# Altium PCB PCB2wires.PcbDoc
Units mm, origin at the board's own origin, x right, y up, seen from the top; angles counter-clockwise.
Board outline 60.32 x 64.06 mm, 2 copper layers (Top Layer, Bottom Layer); 15 components, 13 nets, 88 pads, 48 vias.
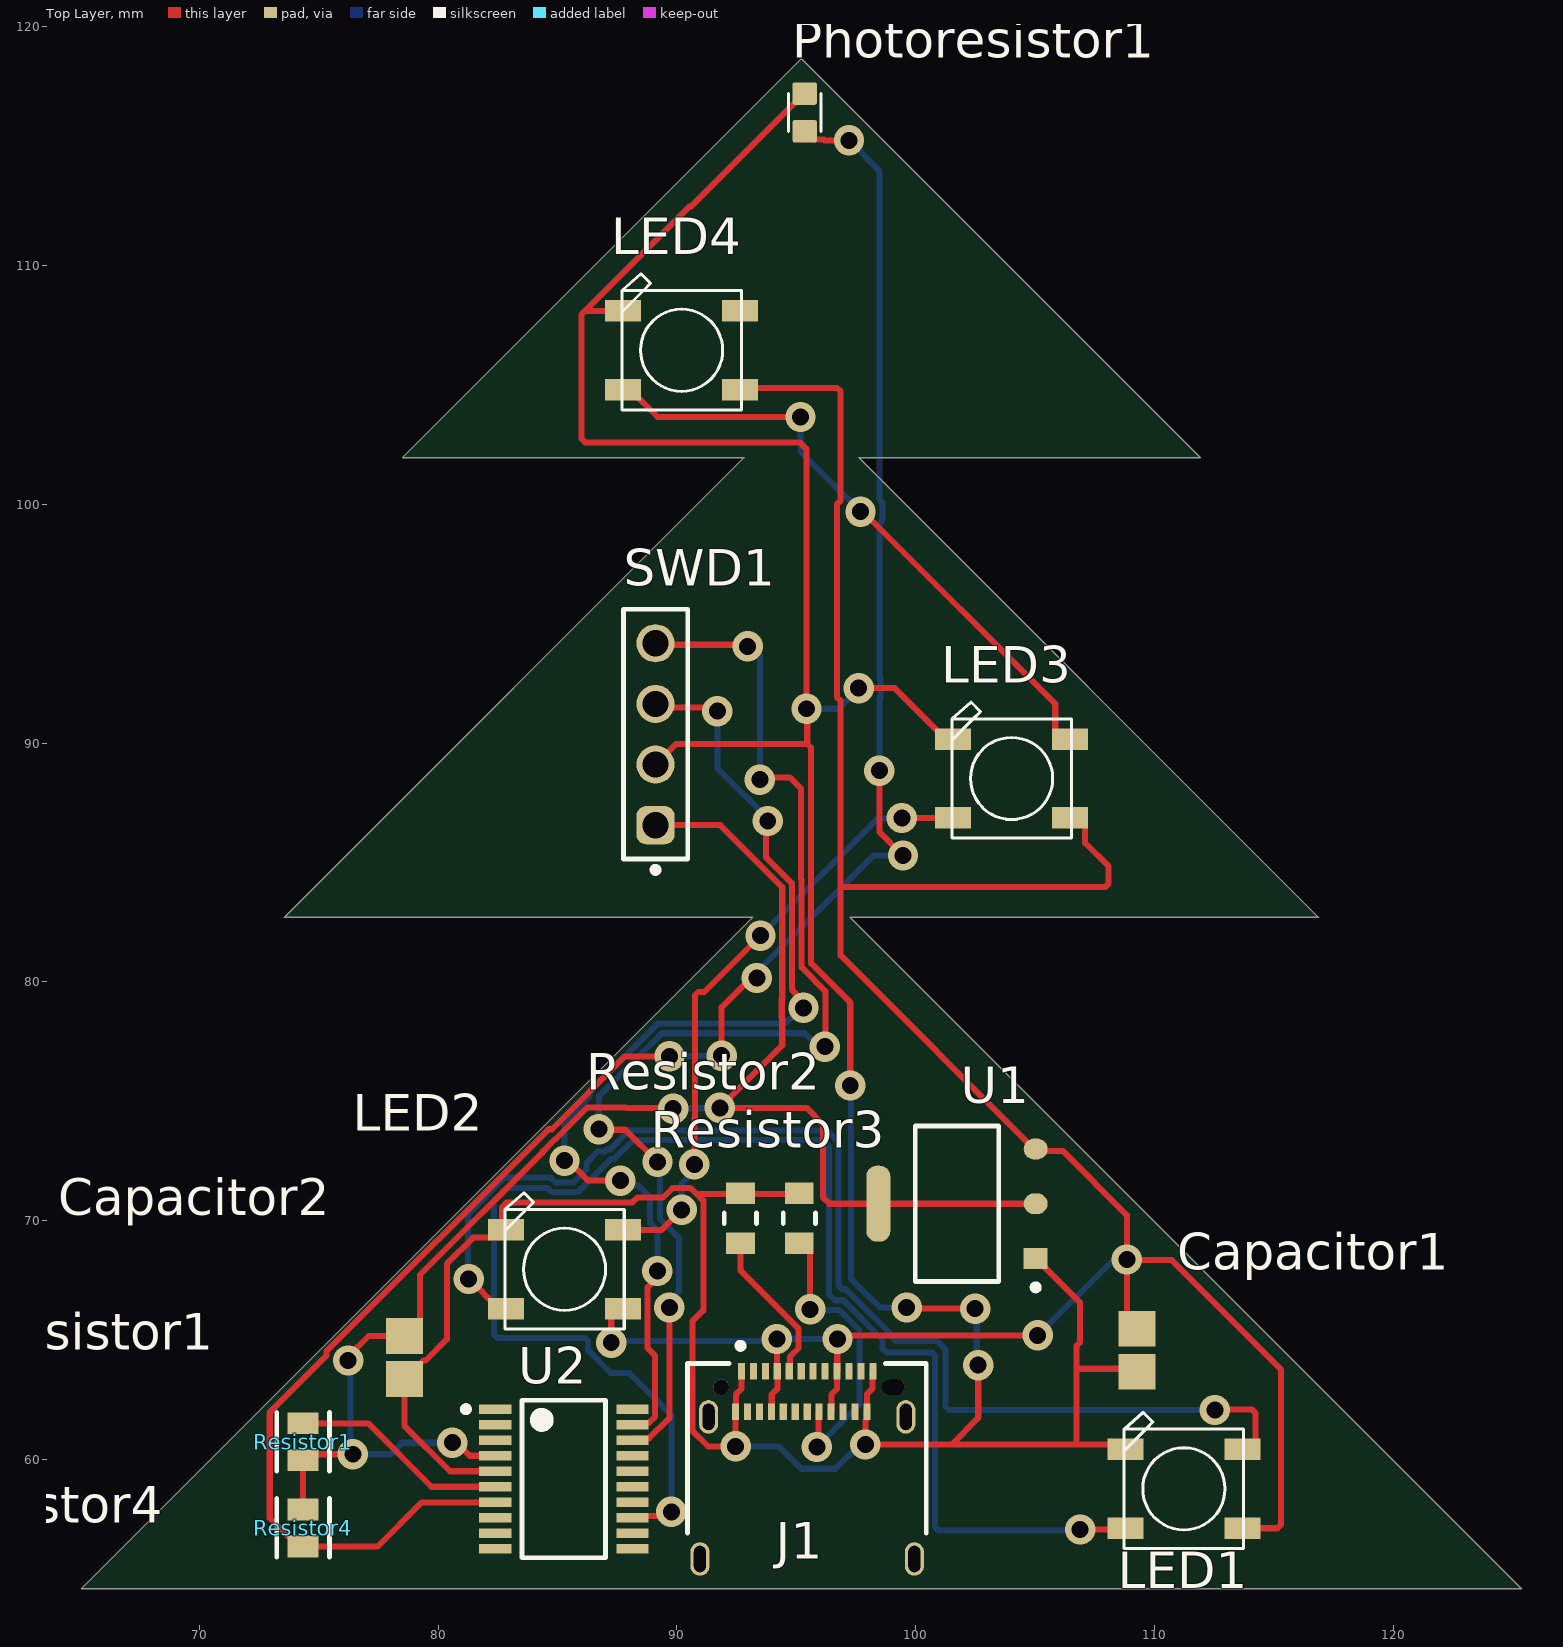
[diagram p0: Top Layer view]
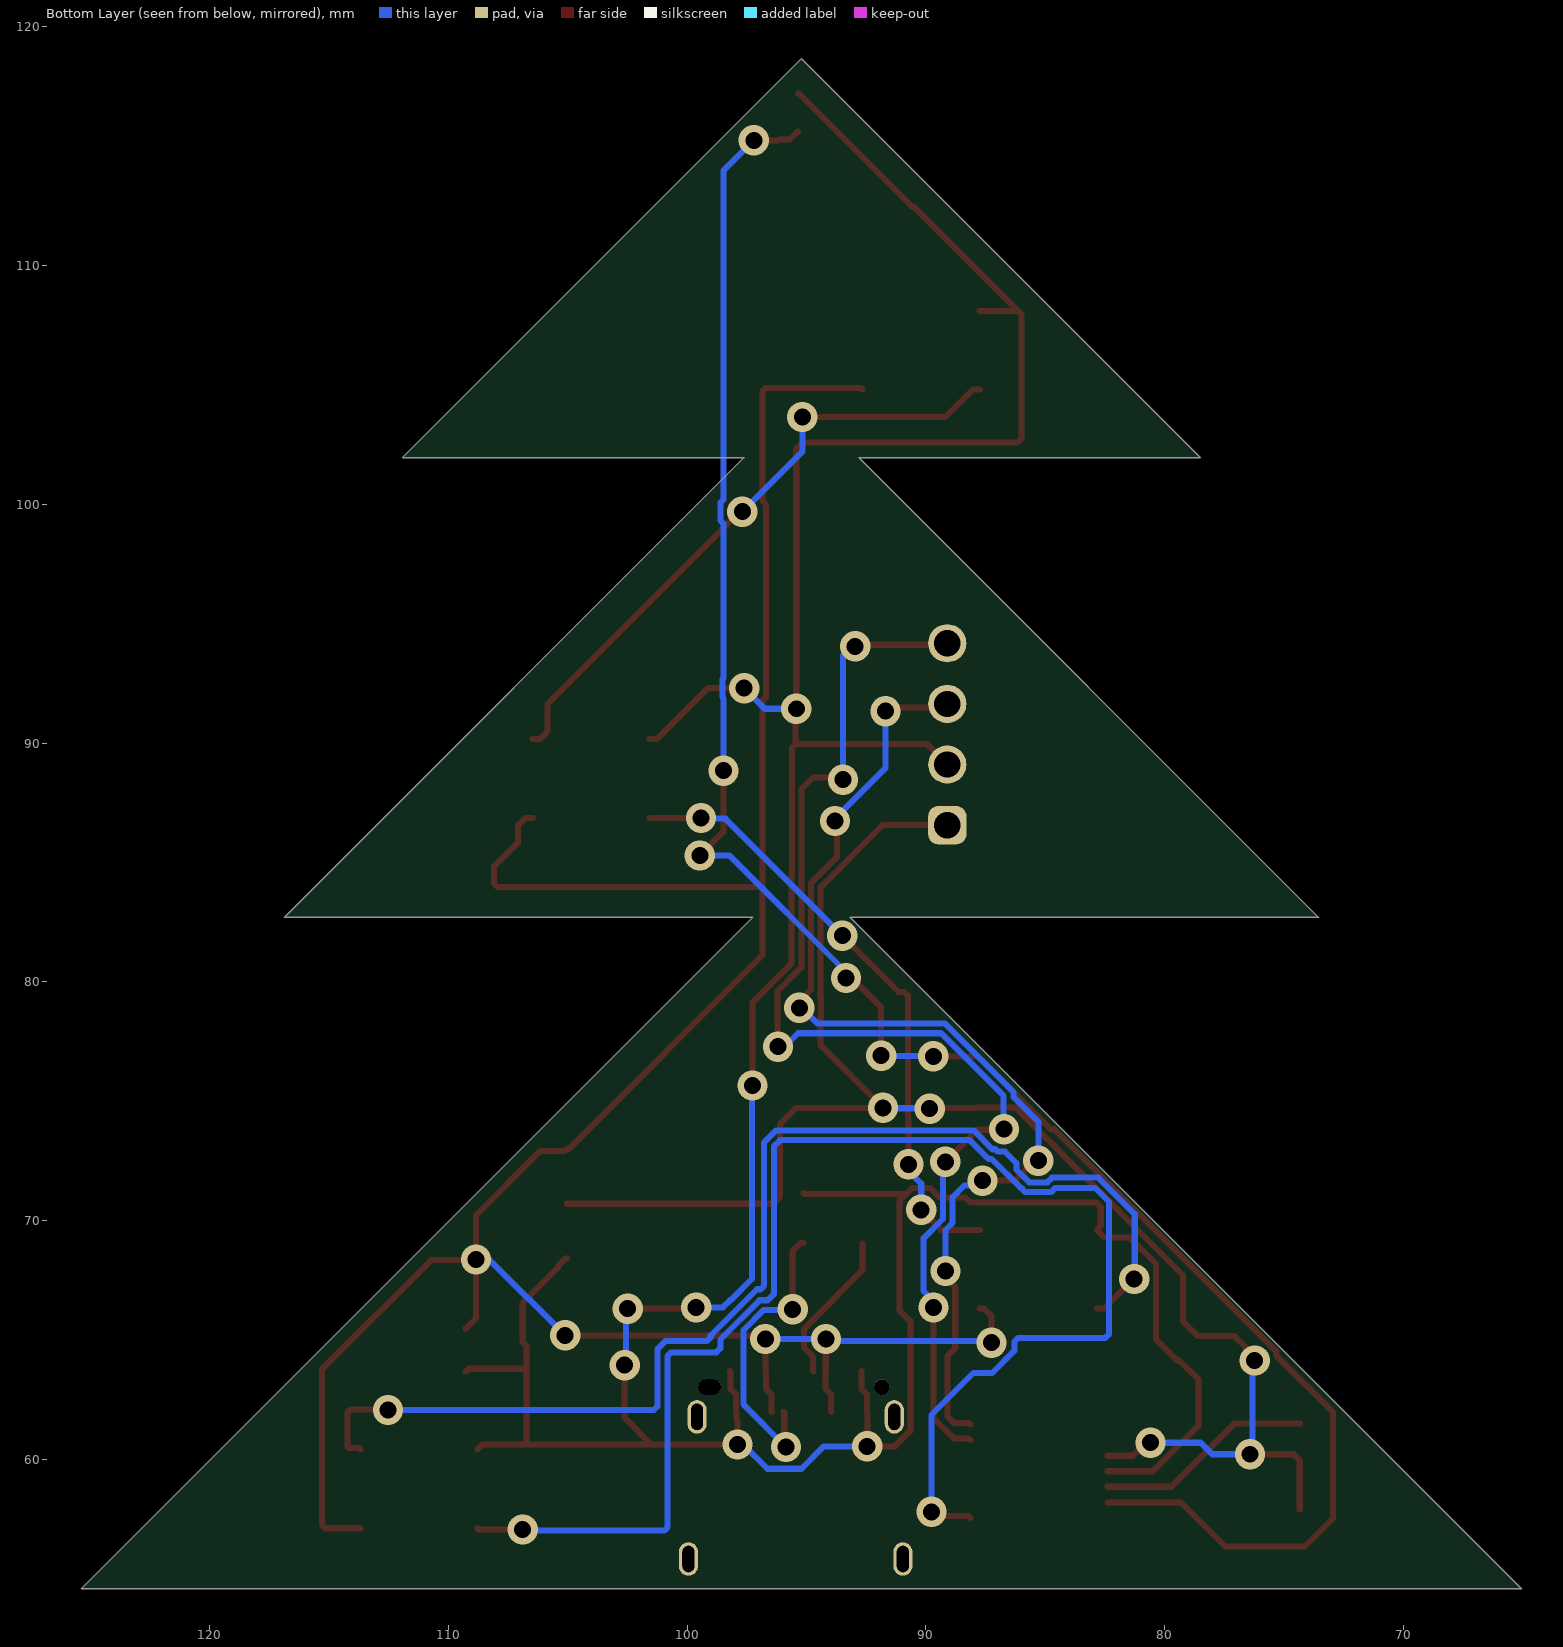
[diagram p1: Bottom Layer view, seen from below]
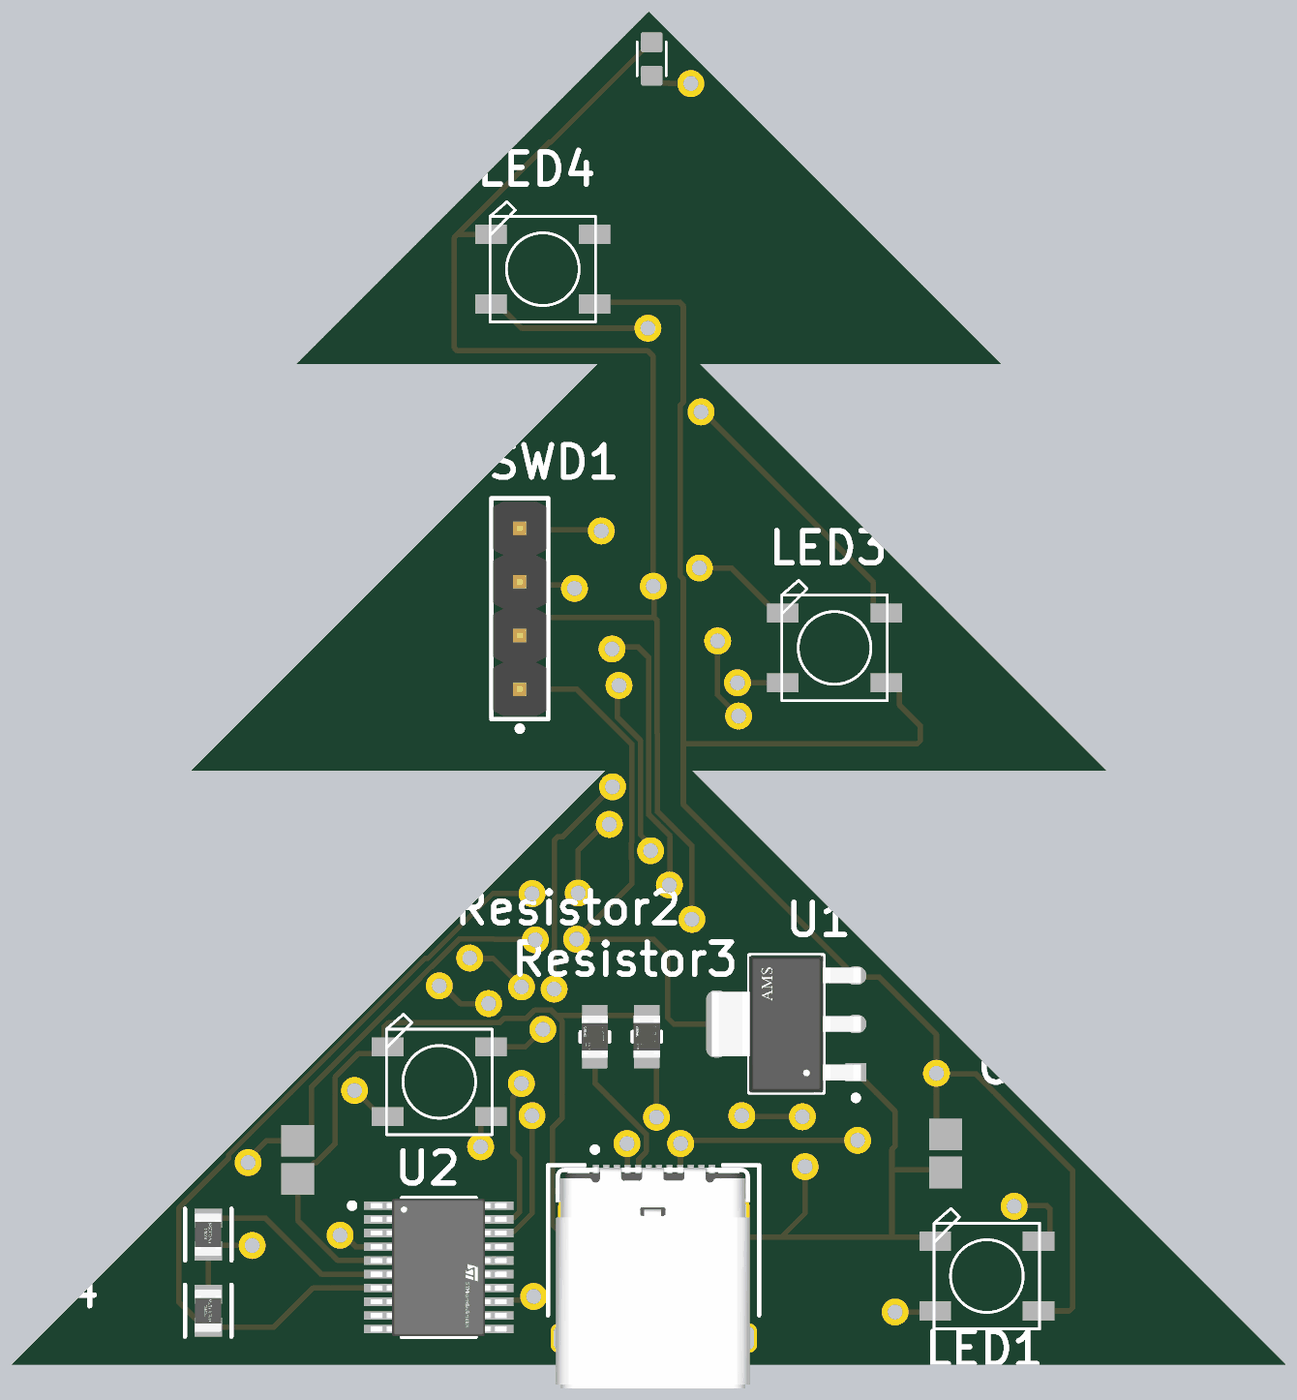
[diagram p2: 3D render of the assembled board from above, using the file's embedded part models]

## Layer stack, top to bottom
Top Solder: solder mask 0.0102, Solder Resist, Dk 3.5
Top Layer: signal copper 0.0356
Dielectric 1: dielectric 0.32, FR-4, Dk 4.8
Bottom Layer: signal copper 0.0356
Bottom Solder: solder mask 0.0102, Solder Resist, Dk 3.5

## Board outline
73.558,82.702 93.167,82.702 65.049,54.585 125.374,54.585 97.257,82.702 116.865,82.702 97.612,101.956 111.912,101.956 95.225,118.643 95.199,118.643 78.511,101.956 92.812,101.956

## Design rules (kind name [scope] priority, off if disabled: settings)
Clearance [All] p1: gap=0.15 ignorepadtopadclearanceinfootprint=TRUE
MinimumSolderMaskSliver [All] p1: minsoldermaskwidth=0
PolygonConnect [All] p1: connectstyle=Relief reliefconductorwidth=0.254 reliefentries=4 polygonreliefangle="90 Angle" airgapwidth=0.254
RoutingVias [All] p1: holewidth=0.711 width=1.27 viastyle="Through Hole" minholewidth=0.711 minwidth=1.27 maxholewidth=0.711 maxwidth=1.27
SilkToSilkClearance [All] p1: silktosilkclearance=0
SilkToSolderMaskClearance [IsPad] p1: minsilkscreentomaskgap=0 clearancetoexposedcopper=TRUE
SolderMaskExpansion [All] p1: expansion=0 istentingtop=FALSE
SupplyNets "Schematic Supply Nets_2" [InNet('+5V')] p1: voltage=0.000
SupplyNets "Schematic Supply Nets_1" [InNet('+3.3V')] p2: voltage=0.000
SupplyNets "Schematic Supply Nets" [InNet('GND')] p3: voltage=0.000
Width [All] p1: maxlimit=0.254 minlimit=0.254 preferedwidth=0.254
27 further rules are at their usual default settings.

## Classes and differential pairs
component class Sheet1: Capacitor1 Capacitor2 LED1 LED2 LED3 LED4 Photoresistor1 Resistor1 Resistor2 Resistor3 Resistor4 SWD1 U1 U2

## Components (designator, comment, footprint, x,y, rotation, side; value= is the part's Value field where it differs from the comment)
Capacitor1 "08056D106KAT4A" CAPC2013X140X50ML20T25 109.271,64.581 r90 top
Capacitor2 "08056D106KAT4A" CAPC2013X140X50ML20T25 78.588,64.276 r90 top
J1 "12401832E402A" FP-12401832E402A-MFG 95.453,58.674 r0 top
LED1 "WS2812B" *WS2812B_WS2812B(Primary) 111.227,58.776 r0 top
LED2 "WS2812B" *WS2812B_WS2812B(Primary) 85.293,67.97 r0 top
LED3 "WS2812B" *WS2812B_WS2812B(Primary) 104.013,88.519 r0 top
LED4 "WS2812B" *WS2812B_WS2812B(Primary) 90.195,106.451 r0 top
Photoresistor1 "1-1614350-8" RESC1608X50N 95.352,116.408 r90 top
Resistor1 "CRGCQ0805J10K" FP-CRGCQ0805-IPC_C 74.346,60.743 r90 top value=10KΩ
Resistor2 "RT0805BRD075K1L" FP-RT0805-MFG 92.659,70.104 r90 top value=5.1KΩ
Resistor3 "RT0805BRD075K1L" FP-RT0805-MFG 95.123,70.113 r90 top value=5.1KΩ
Resistor4 "CRGCQ0805J10K" FP-CRGCQ0805-IPC_C 74.346,57.136 r270 top value=10KΩ
SWD1 "61300411121" 61300411121 89.103,90.373 r90 top
U1 "AMS1117-3.3" FP-AMS1117-IPC_C 101.727,70.714 r180 top
U2 "STM32G030F6P6" FP-TSSOP20-YA-MFG 85.263,59.187 r0 top

## Footprints (in the part's own frame and the unit in brackets; to place one, negate y for a bottom-side part, rotate by r counter-clockwise, add the part's x,y. Pads: shape width x height; smd on the part's side, far side on the other; paste and mask are expansions set on the pad)
61300411121 [mm] "Pin Header, pitch 2.54 mm, THT, Vertical, single row, 4p"
  rrect50% 1.6x1.6 hole 1.1: 1(-3.81,0)
  round 1.6 hole 1.1: 2(-1.27,0) 3(1.27,0) 4(3.81,0)
  silkscreen extent -5.8,-1.35 5.23,1.35, body extent -5.08,-1.27 5.08,1.27, height 8.57
*WS2812B_WS2812B(Primary) [mm]
  rect 1.5x0.9 smd: 1-VDD(2.45,-1.65) 2-DOUT(2.45,1.65) 3-GND(-2.45,1.65) 4-DIN(-2.45,-1.65)
  silkscreen extent -2.5,-2.5 2.5,3.2
CAPC2013X140X50ML20T25 [mm] "Chip Capacitor, 2-Leads, Body 2.00x1.25mm, IPC Low Density"
  rect 1.5x1.55 smd: 1(-0.9,0) 2(0.9,0)
  body extent -1.1,-0.72 1.1,0.72, height 1.4
FP-12401832E402A-MFG [mm]
  rrect100% 0.8x1.4 hole 1.1 slot 0.5 at 0 deg paste-2539.97 mask+0: 1(-4.13,3.115) 2(4.13,3.115) 3(-4.49,-2.835) 4(4.49,-2.835)
  rect 0.3x0.7 smd paste+0 mask+0: A1(-2.75,5.025) A2(-2.25,5.025) A3(-1.75,5.025) A4(-1.25,5.025) A5(-0.75,5.025) A6(-0.25,5.025) A7(0.25,5.025) A8(0.75,5.025) A9(1.25,5.025) A10(1.75,5.025) A11(2.25,5.025) A12(2.75,5.025) B1(2.5,3.325) B2(2,3.325) B3(1.5,3.325) B4(1,3.325) B5(0.5,3.325) B6(0,3.325) B7(-0.5,3.325) B8(-1,3.325) B9(-1.5,3.325) B10(-2,3.325) B11(-2.5,3.325) B12(-3,3.325)
  round 0.65 hole 0.65 unplated paste-2539.97 mask+0: ""(-3.6,4.365)
  rrect100% 0.95x0.65 hole 0.65 slot 0.95 at 0 deg unplated paste-2539.97 mask+0: ""(3.6,4.365)
  silkscreen extent -5.01,-1.76 4.99,6.21, body extent -4.99,-5.45 4.99,5.48, height 0.25
FP-AMS1117-IPC_C [mm]
  rect 1.004x0.872 smd paste+0 mask+0: 1(-3.295,2.29)
  rrect100% 1.004x0.872 smd paste+0 mask+0: 2(-3.295,0) 3(-3.295,-2.29)
  rrect87% 1.004x3.182 smd paste+0 mask+0: 4(3.295,0)
  silkscreen extent -3.42,-3.25 1.75,3.62, body extent -3.9,-3.35 3.9,3.35, height 0.25
FP-CRGCQ0805-IPC_C [mm]
  rect 0.906x1.31 smd paste+0 mask+0: 1(-0.776,0) 2(0.776,0)
  silkscreen extent -1.23,-1.1 1.23,1.1, body extent -1,-0.63 1,0.63, height 0.65
FP-RT0805-MFG [mm]
  rect 0.9x1.2 smd paste+0 mask+0: 1(-1.05,0) 2(1.05,0)
  silkscreen extent -0.23,-0.67 0.23,0.67, body extent -1.6,-0.77 1.6,0.77, height 0.25
FP-TSSOP20-YA-MFG [mm]
  rect 1.35x0.4 smd paste+0 mask+0: 1(-2.875,2.925) 2(-2.875,2.275) 3(-2.875,1.625) 4(-2.875,0.975) 5(-2.875,0.325) 6(-2.875,-0.325) 7(-2.875,-0.975) 8(-2.875,-1.625) 9(-2.875,-2.275) 10(-2.875,-2.925) 11(2.875,-2.925) 12(2.875,-2.275) 13(2.875,-1.625) 14(2.875,-0.975) 15(2.875,-0.325) 16(2.875,0.325) 17(2.875,0.975) 18(2.875,1.625) 19(2.875,2.275) 20(2.875,2.925)
  silkscreen extent -4.22,-3.3 1.75,3.3, body extent -3.65,-3.55 3.65,3.55, height 0.25
RESC1608X50N [mm]
  rrect20% 0.94x1.02 smd: 1(-0.79,0) 2(0.79,0)
  silkscreen extent -0.8,-0.69 0.8,0.69

## Part data
Capacitor1 Capacitor2: library part CMP-2007-04644-1, Manufacturer="AVX Interconnect / Elco", Part Number=08056D106KAT4A
J1: library part CMP-02355-000004-1, "CONN RCP USB3.1 TYPEC 24P SMD RA"
Photoresistor1: "RN 0603 12K1 0.1% 10PPM CUT LENGTH /  / PDV-P2002", Package=None, Availability=Unavailable, MP=1-1614350-8, Price=None
Resistor1 Resistor4: library part CMP-03211-002989-1, "CRGCQ 0805 10K 5%", Ambient Temperature Range High=+70°C, Manufacturer="TE Connectivity", Package=CRGCQ0805, Power Rating=0.125W, Resistance=10KΩ, Temperature="-55°C to +155°C", Temperature Coefficient=±100ppm/°C, Temperature Range High=+155°C, Temperature Range Low=-55°C, Tolerance=0.05, Voltage Rating=150V, Automotive=Yes, Automotive Grade="Grade 914", Category=Res, ComponentLink2Description=Datasheet, ComponentLink2URL=https://www.te.com/commerce/DocumentDelivery/DDEController?Action=showdoc&DocId=Data+Sheet%7F1773204-3%7F1%7Fpdf%7FEnglish%7FENG_DS_1773204-3_1.pdf%7F4-2176341-923, Composition="Thick Film", Device Class L1="Passive Components", Device Class L2=Resistors, Device Class L3="Chip SMD Resistors", Digikey Description="CRGCQ 0805 10K 5%", Height=0.65mm, Ipc Land Pattern Name=RESC200125X55, Lead Free=Yes, Manufacturer Part Number=CRGCQ0805J10K, Mouser Description="Res Thick Film 0805 10K Ohm 5% 0.125W(1/8W) ±100ppm/C Pad SMD Automotive T/R", Octopart=https://octopart.com/crgcq0805j10k-te+connectivity-91018201, RoHS=TRUE, Series=CRGCQ
Resistor2 Resistor3: library part CMP-2001-01553-2, "RES SMD 5.1K OHM 0.1% 1/8W 0805", Manufacturer=Yageo, Package=RT0805, Power Rating=0.125W, Resistance=5.1KΩ, Temperature="-55°C to +155°C", Temperature Coefficient="25 ppm/°C", Temperature Range High=+155°C, Temperature Range Low=-55°C, Tolerance=0.0025, Voltage Rating=150V, Automotive=No, Category=Res, ComponentLink2Description=Datasheet, ComponentLink2URL=http://www.yageo.com/documents/recent/PYu-RT_1-to-0.01_RoHS_L_9.pdf, Composition="Thin Film", Device Class L1="Passive Components", Device Class L2=Resistors, Device Class L3="Chip SMD Resistors", Digikey Description="RES SMD 5.1K OHM 0.1% 1/8W 0805", Footprint Url=http://www.yageo.com/exep/pages/download/literatures/PYu-R_Mount_10.pdf, Height=0.6mm, Ipc Land Pattern Name=RESC200125X50, Lead Free=Yes, Manufacturer Part Number=RT0805BRD075K1L, Mouser Description="Res Thin Film 0805 5.1K Ohm 0.1% 1/8W ±10ppm/°C Molded SMD Paper T/R", Octopart=https://octopart.com/rt0805brd075k1l-yageo-1209369, RoHS=TRUE, Series=RT
SWD1: library part CMP-1502-01064-4, "THT Vertical Pin Header WR-PHD, Pitch 2.54 mm, Single Row, 4 pins", Color=Black, Contact Resistance=20mΩ, Current Rating=3A, Max Operating Temperature=105°C, Min Operating Temperature=-40°C, Operating Supply Voltage=250V, Connector Type="Male Pin", Contact Material=Gold, Contact Mating Length=5.9944mm, Contact Plating=Gold, Gender=Male, Height=8.89mm, Lead Free="Lead Free", Lead Pitch=2.54mm, Mount="Through Hole", Number of Contacts=4, Number of Pins=4, Number of Positions=4, Number of Rows=1, Orientation=Vertical, Packaging=Bulk, Pitch=2.54mm, RoHS=Compliant, Termination=Solder, Voltage Rating=250V
U1: library part CMP-209535-000001-1, "LDO Voltage Regulators 1A, 3.3V", Dropout Voltage=1.1V, Manufacturer="Advanced Monolithic Systems", Max Junction Temp=+125°C, Max Power Dissipation=1.2W, Max Supply Voltage=15V, Nominal Supply Current=5mA, Output Current=1A, Output Voltage=3.3V, Package=AMS1117, Temperature="-40°C to +125°C", Temperature Range Low=-40°C, Automotive=No, Category=IC, ComponentLink2Description=Datasheet, ComponentLink2URL=http://www.advanced-monolithic.com/pdf/ds1117.pdf, Device Class L1="Integrated Circuits (ICs)", Device Class L2="Power Management ICs", Device Class L3="Voltage Regulators - Linear", Height=1.8mm, Ipc Land Pattern Name=SOT229P700X180-4, Lead Free=Yes, Manufacturer Part Number=AMS1117-3.3, Number Of Outputs=1, Octopart=https://octopart.com/ams1117-3.3-advanced+monolithic+systems-25899300, Output Type=Fixed, RoHS=TRUE, Standoff Height=0.64mm, Temperature Range High=+125°C
U2: library part CMP-12105-000034-1, "ARM MICROCONTROLLERS - MCU", Ambient Temperature Range High=+85°C, Ambient Temperature Range Low=-40°C, Frequency=64MHz, Manufacturer=STMicroelectronics, Max Junction Temp=+105°C, Max Supply Voltage=3.6V, Min Supply Voltage=2V, Package=TSSOP20-YA, Temperature="-40°C to +85°C", Automotive=No, Category=IC, ComponentLink2Description=Datasheet, ComponentLink2URL=https://www.st.com/resource/en/datasheet/stm32g030f6.pdf, Core Architecture="ARM Cortex-M0+", Data Bus Width=32bits, Device Class L1="Integrated Circuits (ICs)", Device Class L2="Embedded Processors and Controllers", Device Class L3=Microcontrollers, Digikey Description="ARM MICROCONTROLLERS - MCU", Height=1.2mm, Interface=I2C,SPI,USART,LIN,IrDA,I2S,SMBus, Lead Free=Yes, Manufacturer Part Number=STM32G030F6P6, Memory Size=32KBytes, Memory Type=FLASH, Number Of A/D Converters=1, Number Of Adc Channels=16, Number Of Cores=1, Number Of I2C Channels=2, Number Of I/Os=17, Number Of Pwm Channels=11, Number Of Spi Channels=3, Number Of Timers/Counters=6, Number Of Uart Channels=2, Octopart=https://octopart.com/stm32g030f6p6-stmicroelectronics-103773023, Ram Size=8KBytes, RoHS=TRUE, Standoff Height=0.05mm, Temperature Range High=+85°C, Temperature Range Low=-40°C
LED1 LED2 LED3 LED4: SOURCE_URL=https://www.snapeda.com/parts/WS2812B/SparkFun/view-part/?ref=snap

## Via types
v1: diameter 1.27, hole 0.711, Top Layer to Bottom Layer, 48 vias

## Nets (pads, with @x,y where several pads share a name; then routed paths per layer and width w, separated by ;. In a path a pad name is that pad's centre, name@x,y a point inside that pad or via, vN(x,y) a via of type N, cw(c..) or ccw(c..) an arc to the next point about the centre after c; other vN are vias at no path point)
+3.3V: Capacitor2.2 Resistor1.1 Resistor4.1 SWD1.1 U1.2 U1.4 U2.4 | length 69.3
  Top Layer w0.254: Resistor4.1 Resistor1.1 74.603,60.223 v1(76.429,60.223) ; v1(76.235,64.151) 76.235,64.323 77.089,65.176 Capacitor2.2 78.613,65.176 79.236,65.799 79.236,67.729 84.381,72.875 84.381,72.895 84.915,73.429 84.935,73.429 86.254,74.747 87.85,74.747 87.874,74.724 89.811,74.724 v1(89.84,74.695) ; v1(80.594,60.706) 80.788,60.706 81.332,60.162 U2.4 ; SWD1.1 91.816,86.563 94.409,83.97 94.409,79.316 94.389,79.296 94.389,78.54 94.409,78.519 94.409,77.341 v1(91.796,74.727) 95.428,74.727 96.114,74.041 96.114,70.993 96.393,70.714 U1.4 U1.2
  Bottom Layer w0.254: v1(76.235,64.151) 76.332,64.054 76.332,60.32 v1(76.429,60.223) 78.008,60.223 78.49,60.706 v1(80.594,60.706) ; v1(89.84,74.695) 89.856,74.711 91.78,74.711 v1(91.796,74.727)
+5V: Capacitor1.2 J1.A4 J1.A9 J1.B4 J1.B9 LED1.1-VDD LED2.1-VDD LED3.1-VDD LED4.1-VDD U1.3 | length 112
  Top Layer w0.254: v1(87.249,64.897) 87.249,65.997 87.572,66.32 LED2.1-VDD ; LED4.1-VDD 92.721,104.877 96.701,104.877 96.85,104.728 96.85,100.147 96.7,99.997 96.7,91.926 96.85,91.776 96.85,83.972 ; J1.B9 93.971,62.017 93.971,62.73 94.203,62.962 J1.A4 94.193,63.709 94.193,65.039 v1(94.183,65.049) ; J1.B4 96.471,62.017 96.471,62.73 96.703,62.962 J1.A9 96.713,63.709 96.713,65.039 v1(96.723,65.049) 96.876,65.202 v1(105.105,65.202) ; LED3.1-VDD 106.763,86.869 107.086,86.546 107.086,85.829 108.077,84.838 108.077,84.121 107.928,83.972 96.85,83.972 ; Capacitor1.2 108.839,65.913 v1@108.839,68.351 ; LED1.1-VDD 115.142,57.126 115.291,57.274 115.291,63.779 110.719,68.351 v1@108.839,68.351 ; 96.85,83.972 96.85,81.109 104.956,73.004 U1.3 105.102,72.923 106.147,72.923 108.839,70.231 v1(108.839,68.377) v1@108.839,68.351
  Bottom Layer w0.254: v1(87.249,64.897) 87.325,64.973 94.107,64.973 v1(94.183,65.049) v1(96.723,65.049) ; v1(105.105,65.202) 108.28,68.377 v1(108.839,68.377)
GND: Capacitor1.1 Capacitor2.1 J1.A1 J1.A12 J1.B1 J1.B12 LED1.3-GND LED2.3-GND LED3.3-GND LED4.3-GND Photoresistor1.2 Resistor2.2 Resistor3.2 SWD1.2 U1.1 U2.5 | length 167.5
  Top Layer w0.254: U2.5 80.498,59.512 78.588,61.423 Capacitor2.1 78.613,63.376 79.386,64.149 79.477,64.149 80.366,65.038 80.366,68.199 81.464,69.297 82.52,69.297 LED2.3-GND 82.677,69.787 82.677,70.574 82.87,70.767 88.136,70.767 88.34,70.971 89.417,70.971 89.818,71.372 90.573,71.372 90.825,71.12 ; LED4.3-GND 86.153,108.101 ; SWD1.2 89.967,89.967 95.457,89.967 ; J1.A1 92.703,62.962 92.471,62.73 92.471,62.017 J1.B12 92.453,60.556 v1(92.456,60.554) 91.301,60.554 90.646,61.209 90.646,65.792 91.107,66.254 91.107,70.837 90.825,71.12 ; Resistor3.2 95.08,71.12 92.659,71.12 90.825,71.12 ; Photoresistor1.2 95.312,117.198 90.592,112.478 90.53,112.478 86.153,108.101 ; v1(97.257,75.667) 97.257,79.144 95.621,80.779 95.621,84.472 95.606,84.488 95.606,89.818 95.457,89.967 ; v1(97.612,92.304) 99.128,92.304 101.263,90.169 LED3.3-GND ; J1.A12 98.186,63.681 98.186,62.968 97.953,62.736 J1.B1 97.93,61.976 97.93,61.684 97.892,61.646 v1(97.892,60.63) 101.498,60.63 ; v1(99.619,66.37) 99.67,66.319 v1(102.489,66.319) ; v1(102.616,63.957) 102.616,61.747 101.498,60.63 ; U1.1 105.088,68.424 105.397,68.115 105.397,68.048 106.88,66.566 106.88,64.922 106.731,64.774 106.731,63.805 ; LED1.3-GND 108.572,60.63 106.731,60.63 ; Capacitor1.1 109.147,63.805 106.731,63.805 ; 86.153,108.101 86.004,107.953 86.004,102.739 86.153,102.591 95.148,102.591 95.428,102.311 v1(95.428,91.44) 95.457,91.411 95.457,89.967 ; 101.498,60.63 106.731,60.63 ; 106.731,60.63 106.731,63.805
  Bottom Layer w0.254: v1(92.456,60.554) 94.271,60.554 95.209,59.616 96.632,59.616 97.646,60.63 v1(97.892,60.63) ; v1(95.428,91.44) 96.749,91.44 v1(97.612,92.304) ; v1(97.257,75.667) 97.282,75.641 97.282,67.564 98.171,66.675 98.196,66.675 98.501,66.37 v1(99.619,66.37) ; v1(102.489,66.319) 102.552,66.256 102.552,64.021 v1(102.616,63.957)
NetJ1_A5: J1.A5 Resistor2.1 | length 6.5
  Top Layer w0.254: Resistor2.1 92.659,67.919 95.095,65.483 95.095,64.672 94.726,64.303 94.726,63.722 J1.A5
NetJ1_B5: J1.B5 Resistor3.1 | length 12.6
  Top Layer w0.254: Resistor3.1 95.257,69.063 95.58,68.74 v1(95.58,66.294) ; v1(95.86,60.528) 95.93,60.599 95.93,61.976 J1.B5
  Bottom Layer w0.254: v1(95.58,66.294) 95.606,66.269 96.794,66.269 97.635,65.427 97.635,62.304 v1(95.86,60.528)
NetLED1_2-DOUT: LED1.2-DOUT LED2.4-DIN | length 51.5
  Top Layer w0.254: v1(81.278,67.564) 81.3,67.564 82.543,66.32 LED2.4-DIN ; v1(112.522,62.078) 112.547,62.103 114.075,62.103 114.224,61.954 114.224,60.528 114.173,60.477 113.728,60.477 LED1.2-DOUT
  Bottom Layer w0.254: v1(81.278,67.564) 81.255,67.587 81.255,70.282 82.779,71.806 84.715,71.806 84.915,71.605 85.671,71.605 86.205,72.139 86.205,72.413 86.693,72.9 86.99,72.9 87.085,72.995 87.213,72.995 88.002,73.783 96.274,73.783 96.772,73.286 96.772,67.281 96.92,67.132 97.073,67.132 99.009,65.196 99.009,65.122 99.158,64.973 100.889,64.973 101.244,64.618 101.244,62.226 101.393,62.078 v1(112.522,62.078)
NetLED1_4-DIN: LED1.4-DIN U2.13 | length 62.9
  Top Layer w0.254: U2.13 88.211,57.635 89.588,57.635 v1(89.764,57.81) ; v1(106.883,57.074) 108.725,57.074 LED1.4-DIN
  Bottom Layer w0.254: v1(89.764,57.81) 89.764,61.874 88.011,63.627 87.229,63.627 86.284,64.572 86.284,64.951 86.135,65.1 82.481,65.1 82.332,65.249 82.332,70.788 82.918,71.374 84.575,71.374 84.748,71.201 85.838,71.201 86.011,71.374 86.035,71.374 87.252,72.591 87.381,72.591 88.169,73.379 96.107,73.379 96.368,73.119 96.368,66.929 96.624,66.673 96.961,66.673 98.605,65.029 98.605,64.662 98.777,64.491 100.664,64.491 100.813,64.342 100.813,57.172 100.961,57.023 106.832,57.023 v1(106.883,57.074)
NetLED2_2-DOUT: LED2.2-DOUT LED3.4-DIN | length 25.9
  Top Layer w0.254: LED2.2-DOUT 89.356,69.62 v1(90.195,70.46) ; v1(90.729,72.365) 90.729,74.294 90.752,74.317 90.752,79.429 90.901,79.578 91.135,79.578 v1(93.497,81.94) ; v1(99.416,86.868) LED3.4-DIN LED3.4-DIN
  Bottom Layer w0.254: v1(90.195,70.46) 90.195,71.556 90.729,72.09 v1(90.729,72.365) ; v1(93.497,81.94) 98.4,86.843 99.39,86.843 v1(99.416,86.868)
NetLED3_2-DOUT: LED3.2-DOUT LED4.4-DIN | length 26.3
  Top Layer w0.254: LED4.4-DIN 88.045,104.801 89.189,103.657 v1(95.174,103.657) ; v1(97.688,99.695) 97.79,99.695 105.84,91.645 105.84,90.492 106.163,90.169 LED3.2-DOUT
  Bottom Layer w0.254: v1(95.174,103.657) 95.174,102.21 v1(97.688,99.695)
NetPhotoresistor1_1: Photoresistor1.1 Resistor4.2 U2.7 | length 85.8
  Top Layer w0.254: U2.7 79.32,58.212 77.467,56.36 Resistor4.2 74.144,56.36 72.949,57.555 72.949,61.976 75.323,64.35 75.323,64.528 84.628,73.833 84.768,73.833 87.821,76.886 v1(89.687,76.886) ; v1(91.872,76.911) 91.872,78.943 93.091,80.162 v1(93.345,80.162) ; Photoresistor1.1 95.695,115.275 96.154,115.275 96.19,115.24 v1(97.206,115.24) ; v1(98.476,88.849) 98.476,86.284 v1(99.466,85.293)
  Bottom Layer w0.254: v1(89.687,76.886) 89.7,76.898 91.859,76.898 v1(91.872,76.911) ; v1(93.345,80.162) 93.345,80.416 98.222,85.293 v1(99.466,85.293) ; v1(97.206,115.24) 98.476,113.97 98.476,100.197 98.6,100.073 98.6,99.317 98.476,99.193 98.476,92.73 98.524,92.681 98.524,91.926 98.476,91.877 v1(98.476,88.849)
NetResistor1_2: Resistor1.2 U2.6 | length 9.1
  Top Layer w0.254: Resistor1.2 77.065,61.519 79.722,58.862 U2.6
NetSWD1_3: SWD1.3 U2.19 | length 45.4
  Top Layer w0.254: v1(85.293,72.517) 85.442,72.517 86.281,71.679 v1(87.63,71.679) ; U2.19 88.211,61.535 88.828,61.535 89.09,61.797 89.09,64.344 88.77,64.664 88.77,67.21 89.179,67.619 v1(89.179,67.894) ; SWD1.3 89.256,91.491 91.542,91.491 v1(91.694,91.338) ; v1(93.802,86.741) 93.726,86.665 93.726,85.225 94.813,84.137 94.813,79.68 95.301,79.193 v1(95.301,78.918)
  Bottom Layer w0.254: v1(85.293,72.517) 85.293,74.143 86.337,75.186 86.337,75.397 89.195,78.255 94.527,78.255 95.19,78.918 v1(95.301,78.918) ; v1(87.63,71.679) 87.824,71.484 88.383,71.484 88.879,70.988 88.879,69.914 89.179,69.614 v1(89.179,67.894) ; v1(91.694,91.338) 91.694,88.956 93.802,86.848 v1(93.802,86.741)
NetSWD1_4: SWD1.4 U2.18 | length 51.4
  Top Layer w0.254: v1(86.731,73.835) 86.754,73.812 87.84,73.812 v1(89.186,72.467) ; U2.18 88.211,60.885 88.828,60.885 89.682,61.74 v1(89.682,66.37) ; SWD1.4 89.167,94.12 92.9,94.12 v1(92.964,94.056) ; v1(93.472,88.468) 93.574,88.57 94.717,88.57 95.202,88.085 95.202,84.32 95.217,84.305 95.217,80.612 96.213,79.617 96.213,77.315 v1(96.19,77.292)
  Bottom Layer w0.254: v1(86.731,73.835) 86.741,73.845 86.741,75.229 89.363,77.851 95.356,77.851 95.915,77.292 v1(96.19,77.292) ; v1(89.186,72.467) 89.283,72.369 89.283,70.082 90.091,69.274 90.091,67.054 89.682,66.645 v1(89.682,66.37) ; v1(92.964,94.056) 93.091,94.056 93.472,93.675 v1(93.472,88.468)
pads on no net: J1. J1.1 J1.2 J1.3 J1.4 J1.A2 J1.A3 J1.A6 J1.A7 J1.A8 J1.A10 J1.A11 J1.B2 J1.B3 J1.B6 J1.B7 J1.B8 J1.B10 J1.B11 LED4.2-DOUT U2.1 U2.2 U2.3 U2.8 U2.9 U2.10 U2.11 U2.12 U2.14 U2.15 U2.16 U2.17 U2.20

## Silkscreen, mask and mechanical layers (free items; w line width, h text height)
Mechanical 1:
  lines w0.254: 65.049,54.585 93.167,82.702 73.558,82.702 92.812,101.956 78.511,101.956 95.199,118.643 95.225,118.643 111.912,101.956 97.612,101.956 116.865,82.702 97.257,82.702 125.374,54.585 95.123,54.585 65.049,54.585